# Altium PCB XY131B 65W-2C1A-V1.PcbDoc (part 1 of 2)
Units mm, origin at the board's own origin, x right, y up, seen from the top; angles counter-clockwise.
Board outline 28.2 x 43.45 mm, 4 copper layers (Top Layer, Signal Layer 1, Signal Layer 2, Bottom Layer), stack 0.778 mm thick; 73 components, 414 nets, 330 pads, 508 vias.
Unrouted connection lines stored in the file: 3.
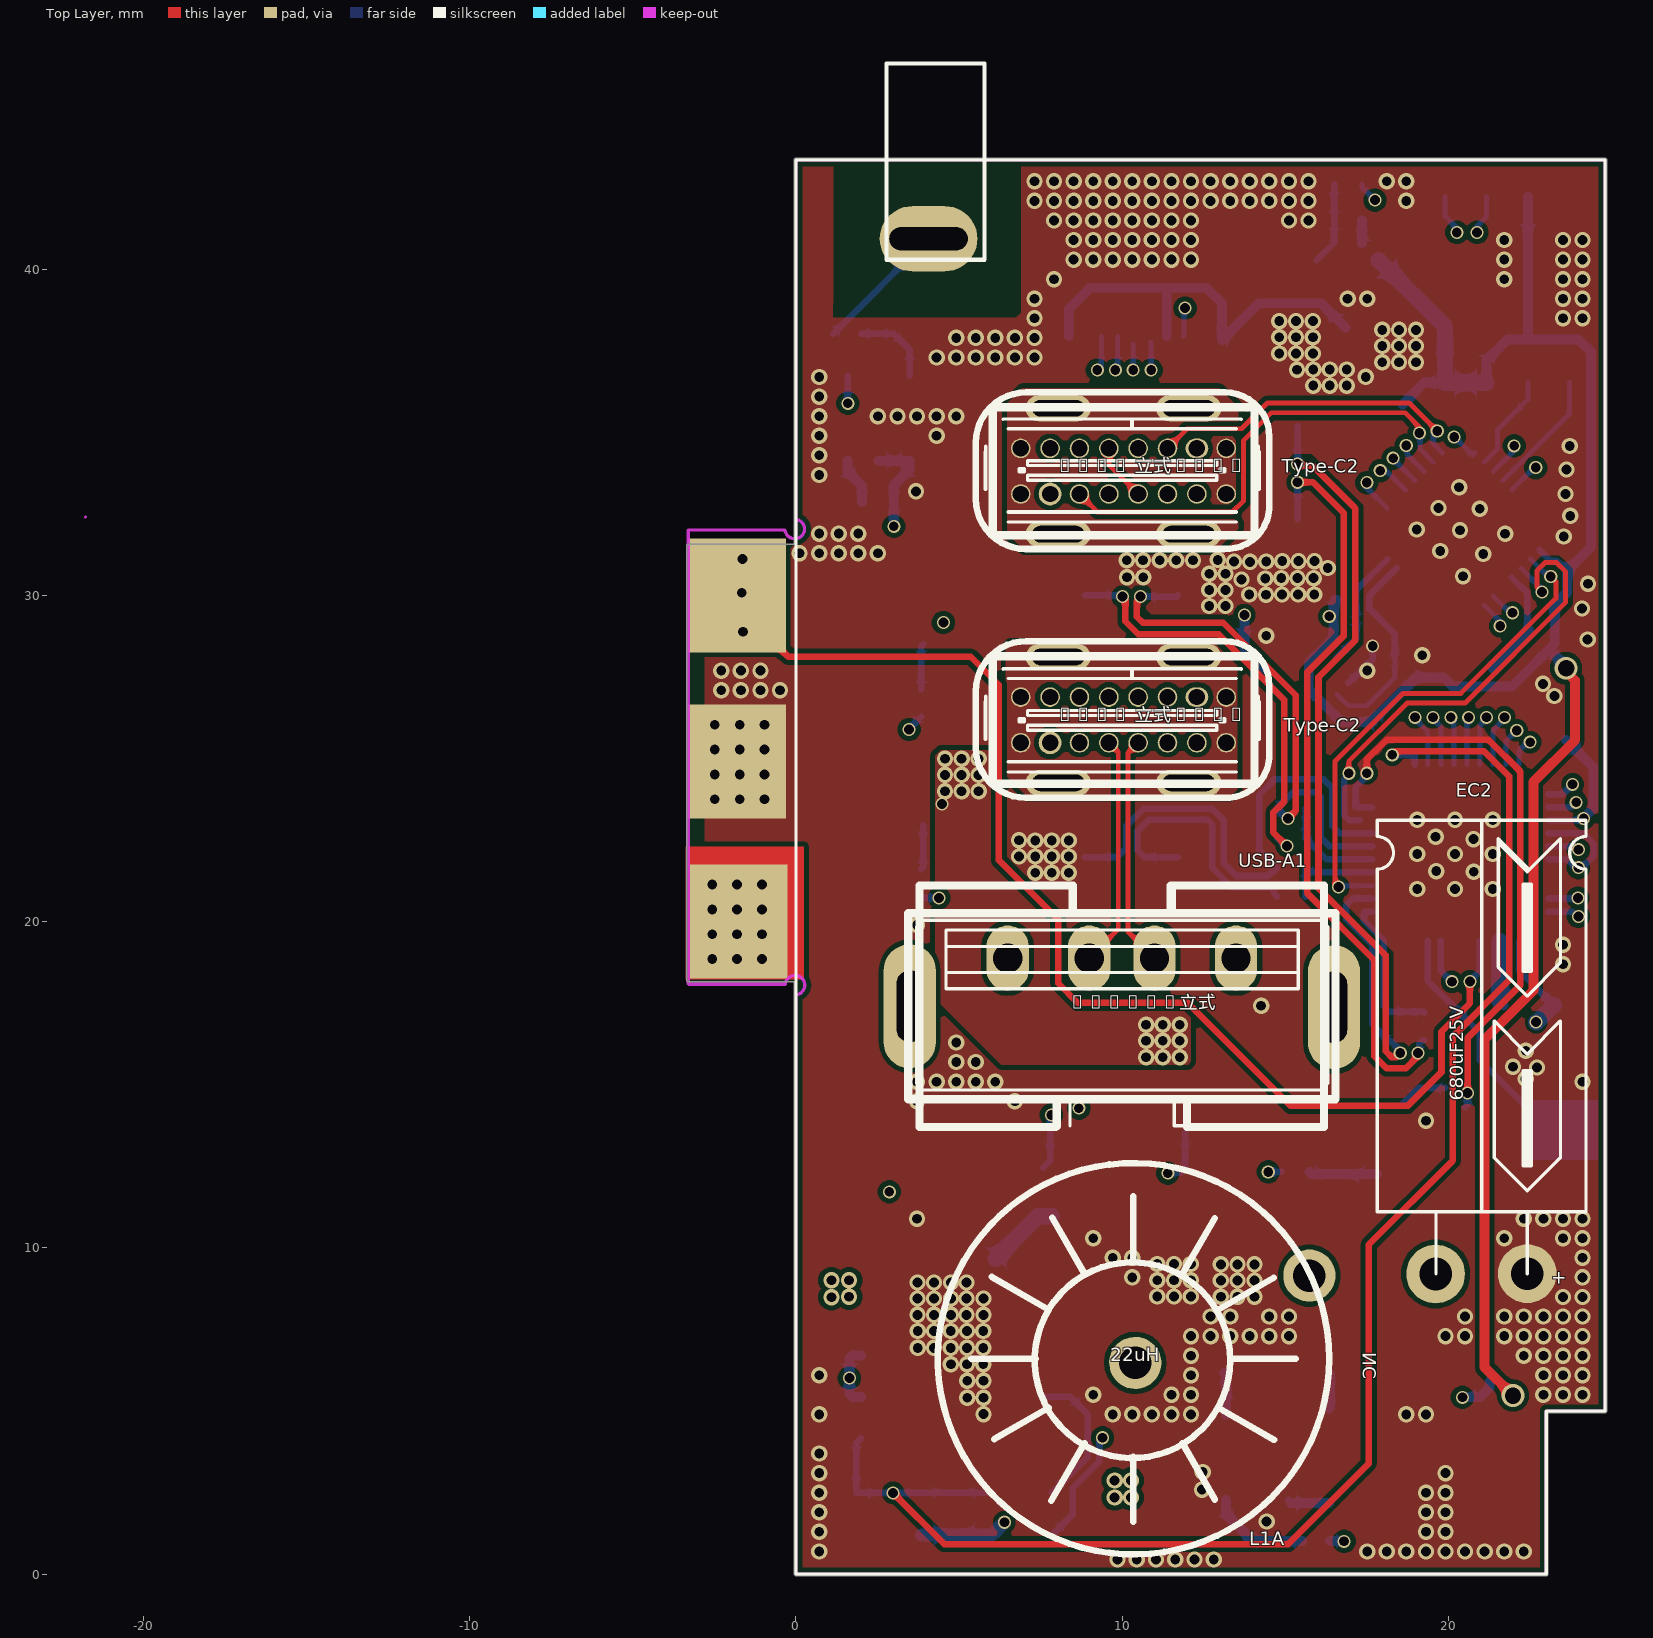
[diagram p0: Top Layer view]
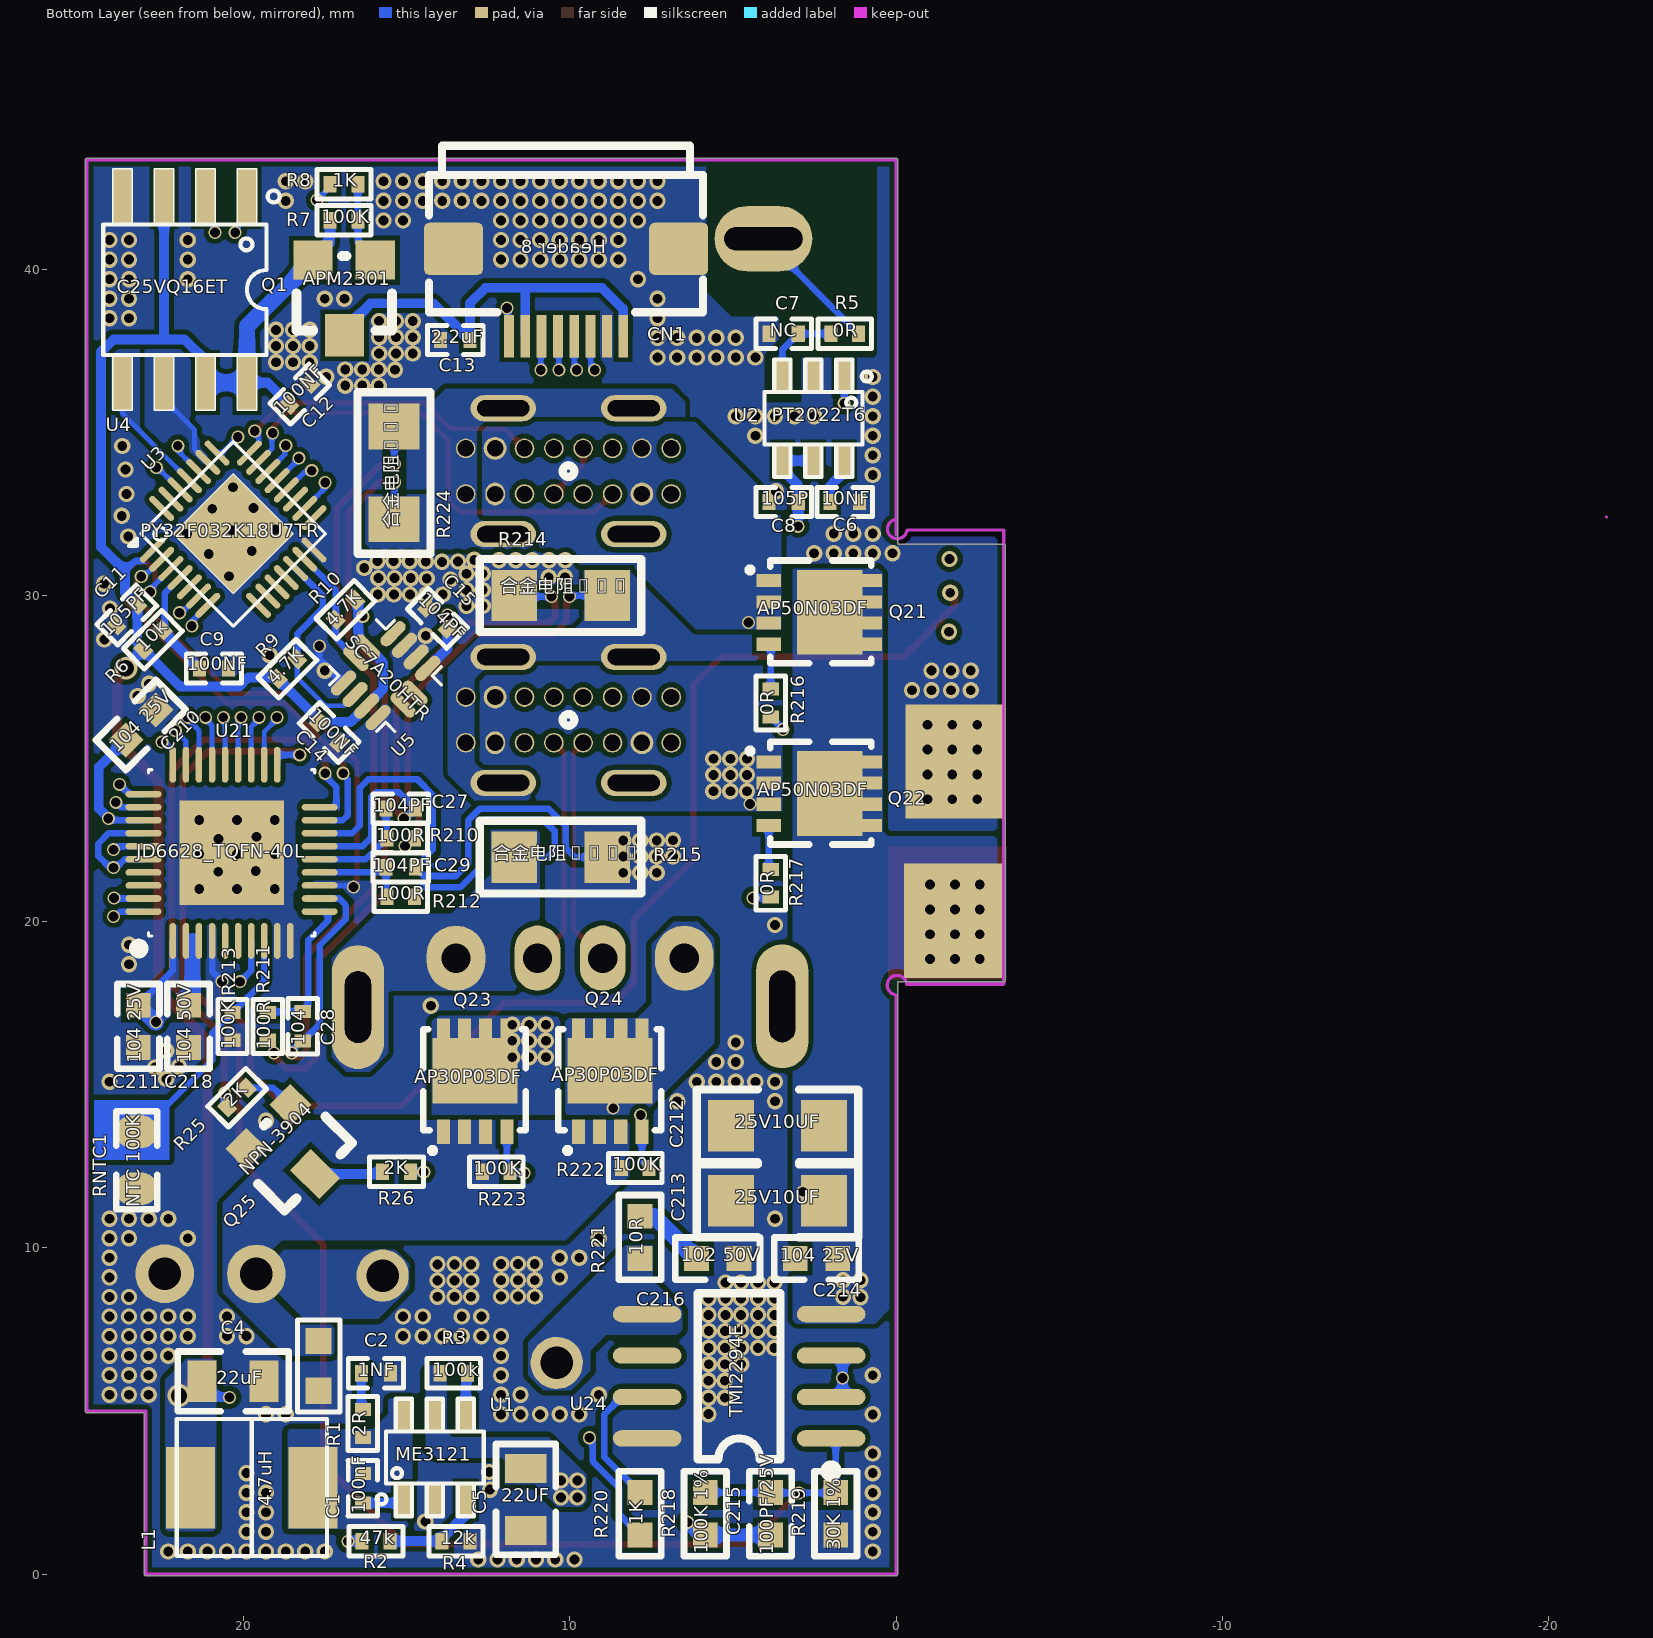
[diagram p1: Bottom Layer view, seen from below]
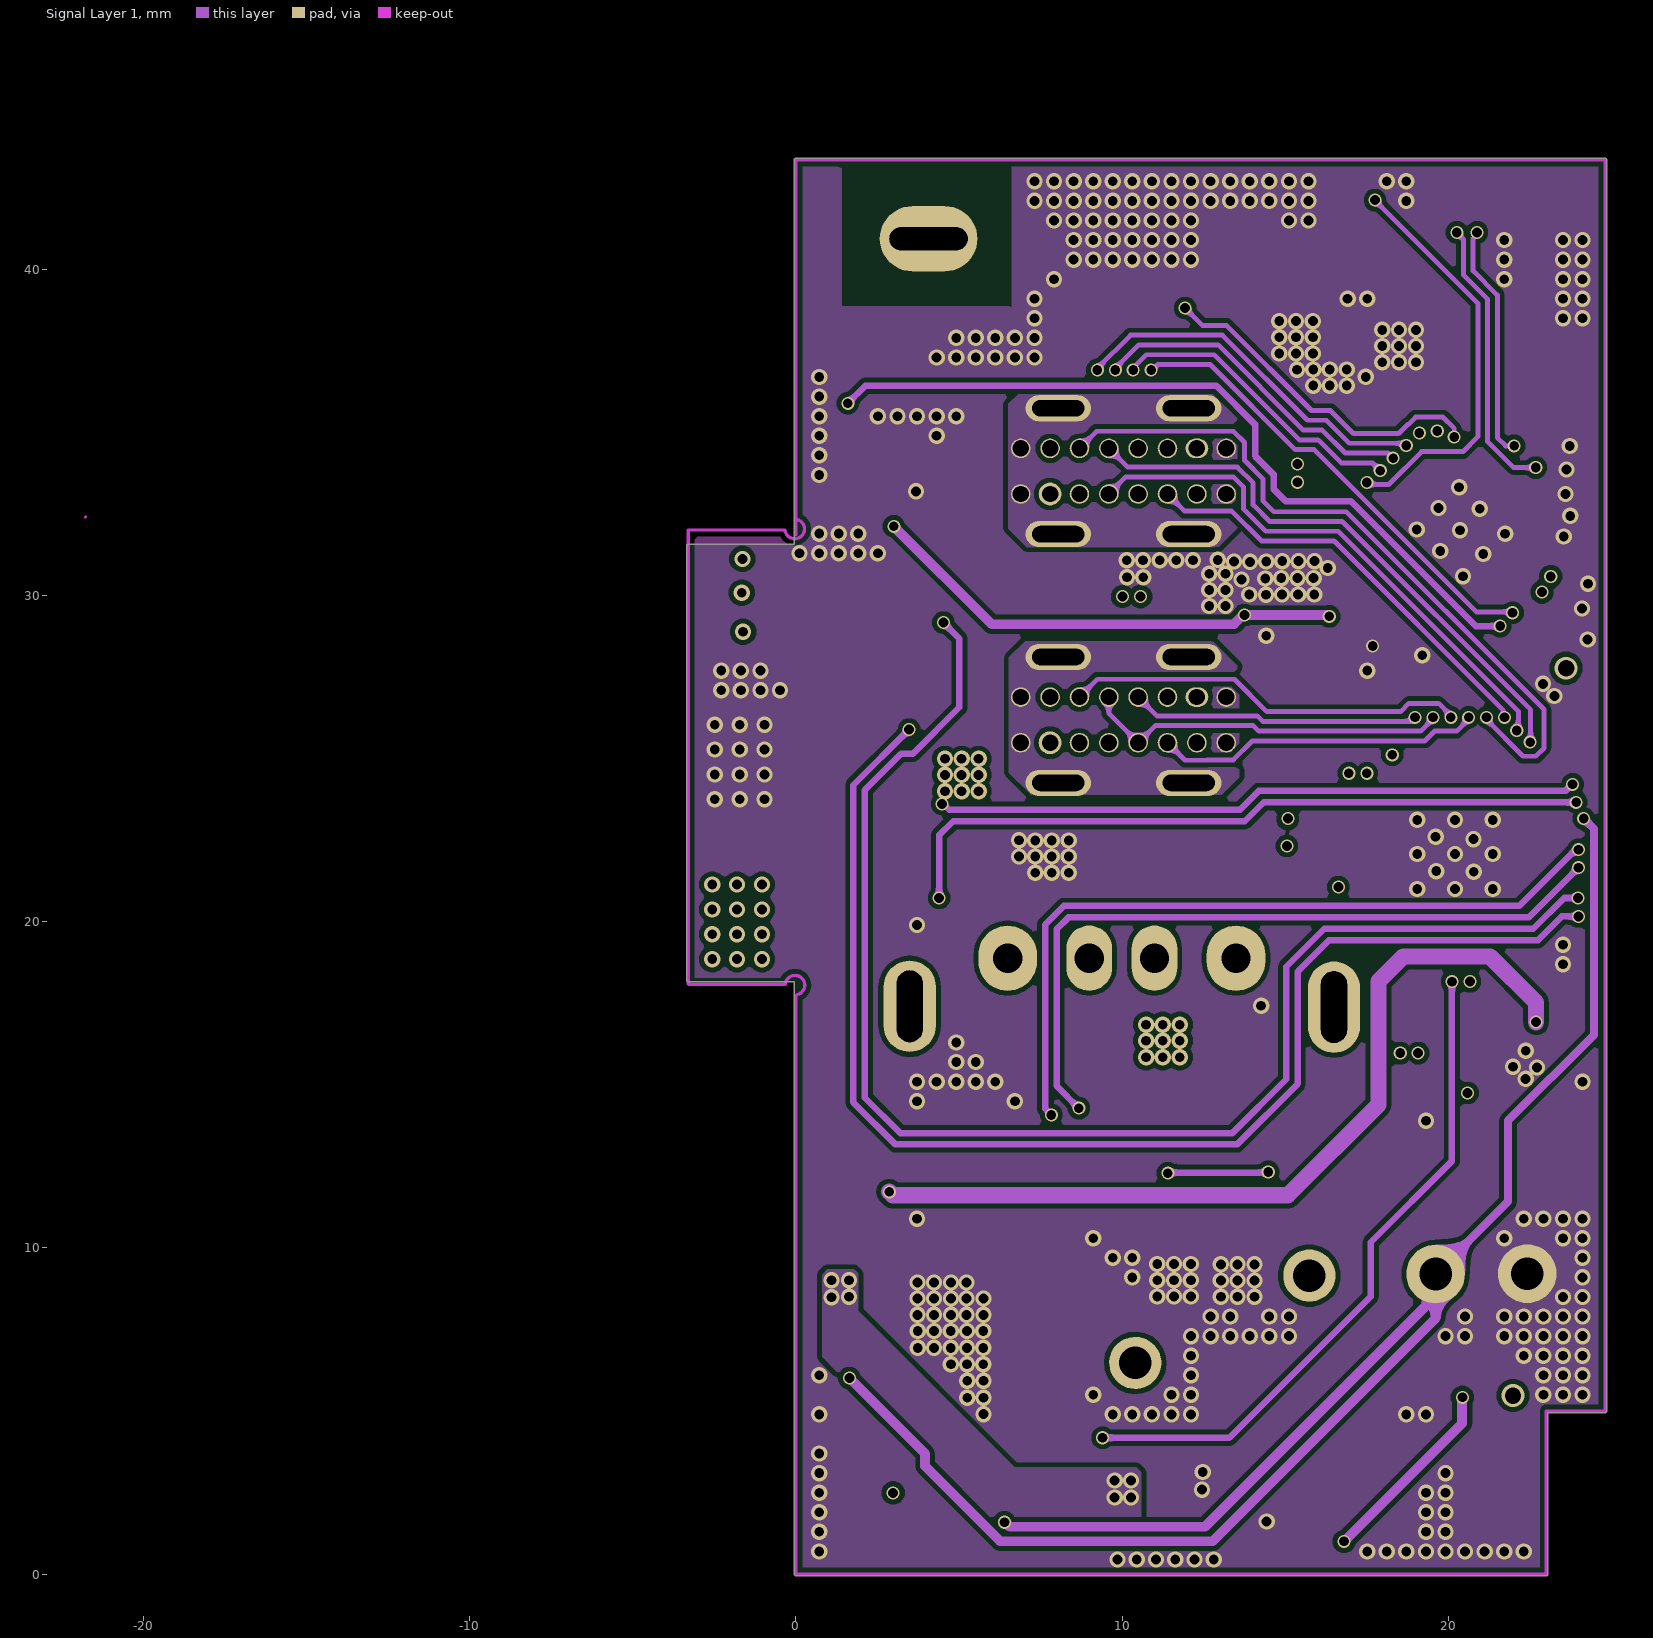
[diagram p2: Signal Layer 1]
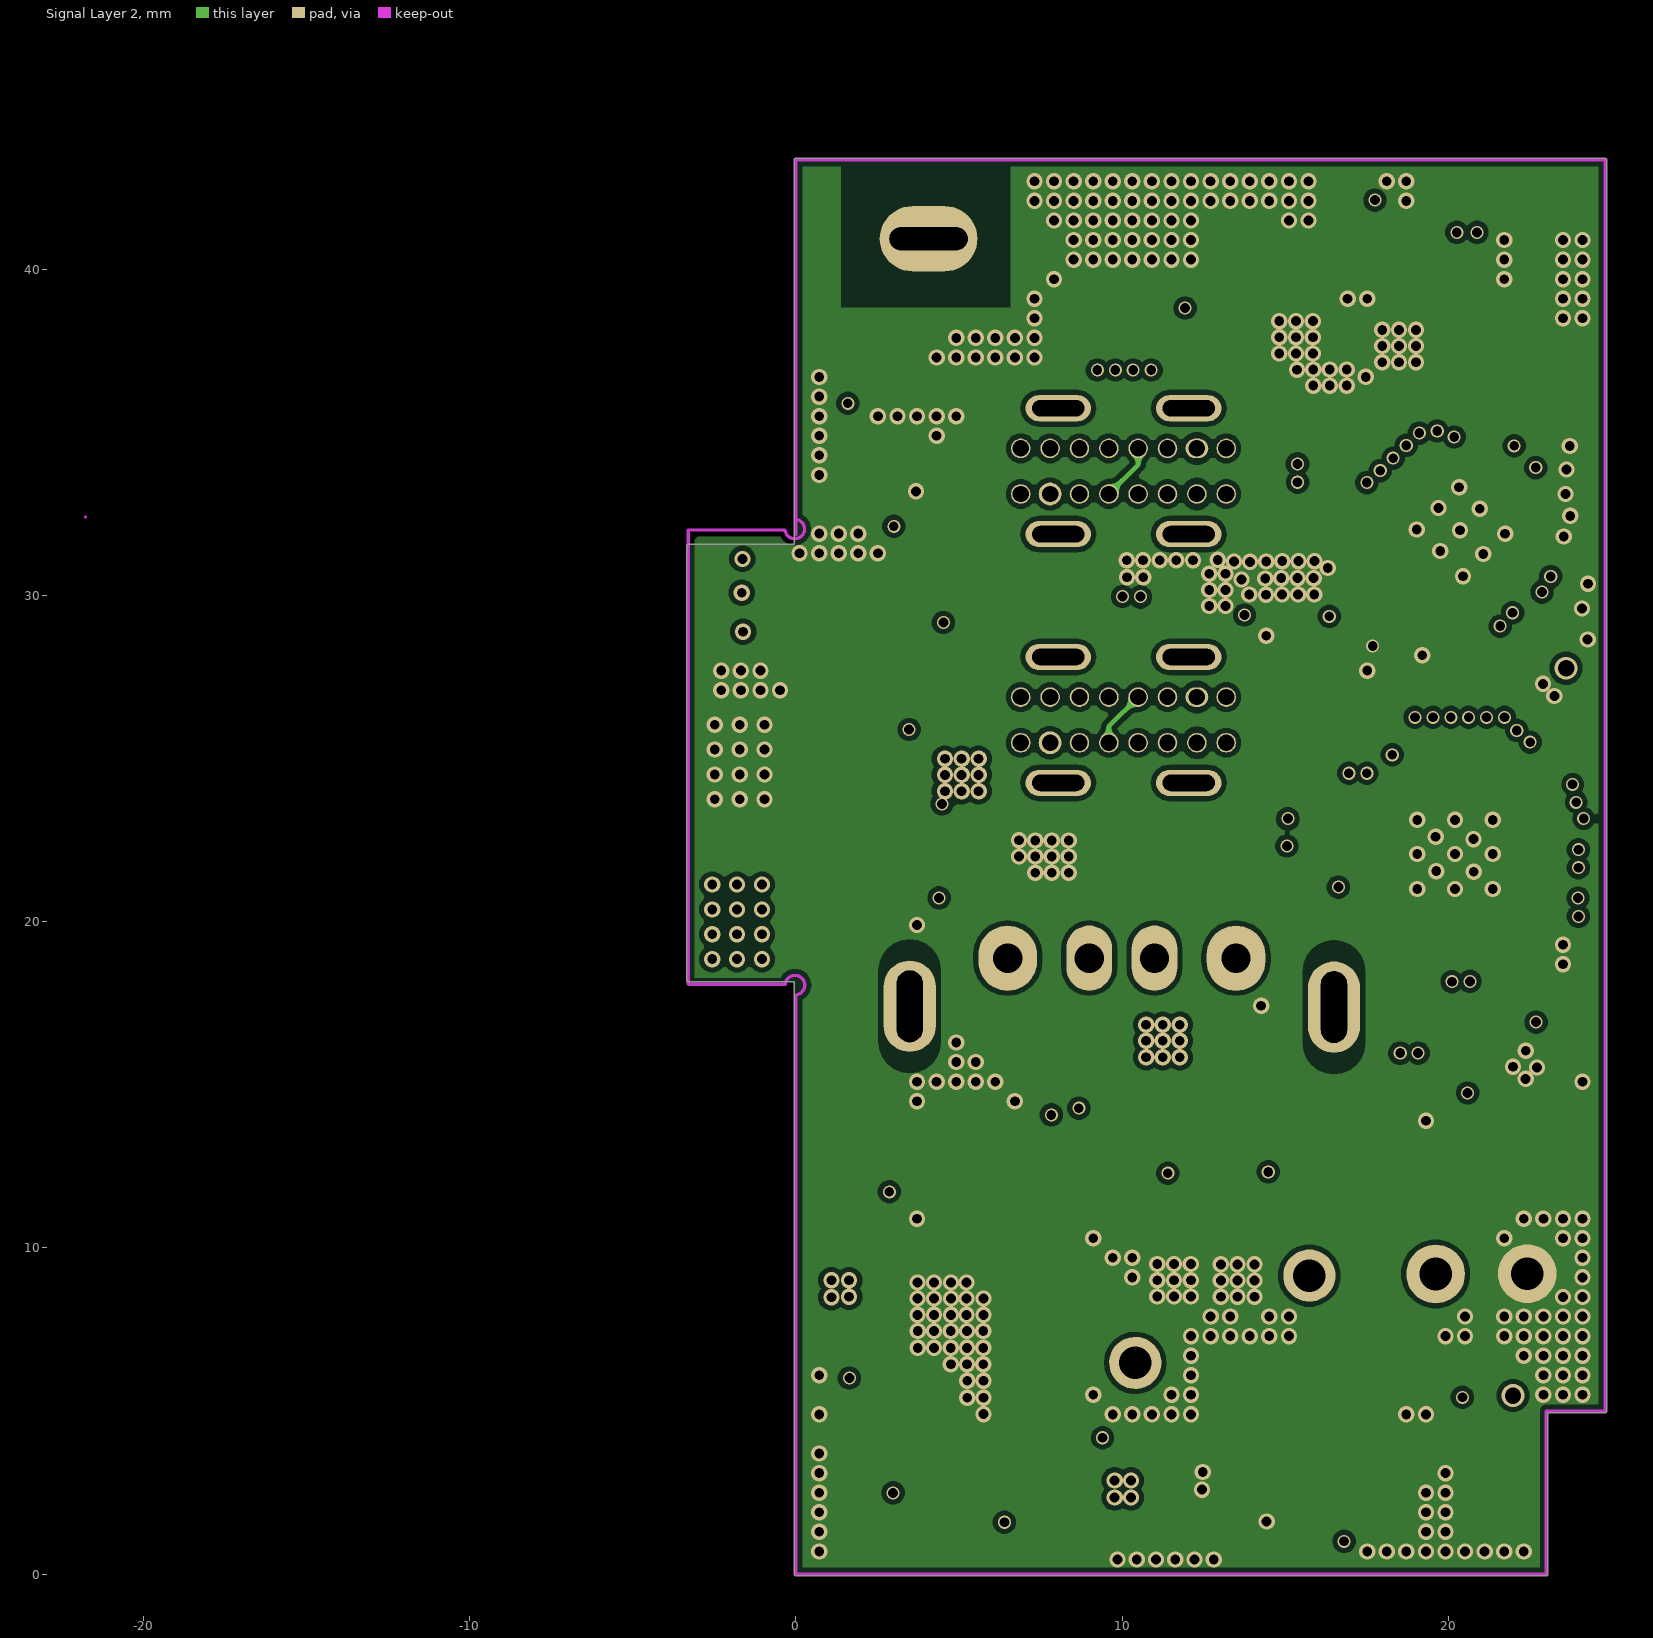
[diagram p3: Signal Layer 2]
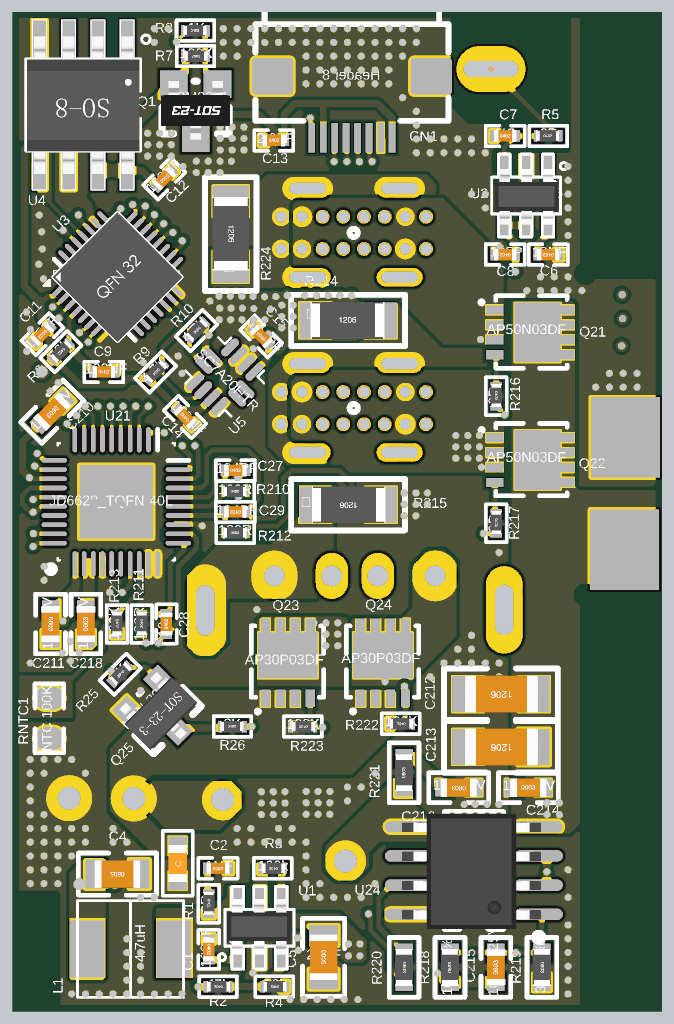
[diagram p5: 3D render of the assembled board from below, using the file's embedded part models]

## Layer stack, top to bottom
Top Solder: solder mask 0.0102, Solder Resist, Dk 3.5
Top Layer: signal copper 0.0356
Dielectric 1: core 0.254, FR-4, Dk 4.2
Signal Layer 1: signal copper 0.036
Dielectric 3: prepreg 0.127, Dk 4.2
Signal Layer 2: signal copper 0.036
Dielectric 2: core 0.254, Dk 4.2
Bottom Layer: signal copper 0.0356
Bottom Solder: solder mask 0.0102, Solder Resist, Dk 3.5

## Board outline
-3.295,18.164 -0.051,18.164 -0.051,0.004 ccw(c0,0.004) -0.036,-0.032 -0.032,-0.036 ccw(c0.004,0) 0.004,-0.051 22.995,-0.051 ccw(c22.995,0) 23.031,-0.036 23.038,-0.029 ccw(c23.003,0.007) 23.053,0.007 23.053,4.951 24.801,4.951 ccw(c24.801,5.001) 24.852,5.001 24.852,43.352 ccw(c24.801,43.352) 24.801,43.402 0.001,43.402 ccw(c0.001,43.352) -0.035,43.388 ccw(c0.028,43.325) -0.035,43.387 -0.035,43.388 -0.035,43.387 ccw(c0,43.351) -0.047,43.37 ccw(c0,43.35) -0.051,43.35 -0.051,31.568 -3.303,31.568 ccw(c-3.303,31.517) -3.353,31.517 -3.353,18.22 ccw(c-3.303,18.22) -3.328,18.176 ccw(c-3.295,18.214)

## Design rules (kind name [scope] priority, off if disabled: settings)
Clearance [All] p1: gap=0.15 ignorepadtopadclearanceinfootprint=FALSE
ComponentClearance [All] p1: gap=0.05 collisioncheckmode=3 verticalgap=0.05 showdistances=FALSE
PlaneConnect [All] p1: planeconnectstyle=Direct reliefexpansion=0.508 reliefentries=4 reliefconductorwidth=0.254 reliefairgap=0.254
PolygonConnect [All] p1: connectstyle=Direct reliefconductorwidth=0.254 reliefentries=4 polygonreliefangle="90 Angle" airgapwidth=0.254
RoutingCorners [All] p1: cornerstyle=45-Degree minsetback=0.1 maxsetback=0.1
RoutingVias [All] p1: holewidth=0.3 width=0.4 viastyle="Through Hole" minholewidth=0.3 minwidth=0.4 maxholewidth=0.3 maxwidth=0.4
SolderMaskExpansion [All] p1: expansion=0.102 istentingtop=FALSE
Width [All] p1: maxlimit=1 minlimit=0.1 preferedwidth=0.15 minimp=50.000000 maximp=50.000000 favimp=50.000000
27 further rules are at their usual default settings.

## Classes and differential pairs
component class "A2674  2C1A大板原理图 20221014 A0": C4/NC

## Components (designator, comment, footprint, x,y, rotation, side; value= is the part's Value field where it differs from the comment)
C1 "100nF" "C 0402_L" 16.344,2.631 r270 bottom (schematic designator C2)
C2 "1NF" "C 0402_L" 15.944,6.161 r0 bottom (schematic designator C4)
C2A "NC" 0603C 17.7,5.62 r90 bottom
C4 "22uF" "C 0805_L" 20.32,5.91 r0 bottom (schematic designator C9)
C5 "22UF" "C 0805_L" 11.35,2.29 r270 bottom (schematic designator C10)
C6 "10NF" "C 0402_L" 1.574,32.864 r0 bottom
C7 "NC" "C 0402_L" 3.449,38.024 r180 bottom (schematic designator C13)
C8 "105P" "C 0402_L" 3.449,32.864 r0 bottom (schematic designator C14)
C9 "100NF" "C 0402_L" 20.91,27.76 r180 bottom (schematic designator C19)
C11 "105PF" "C 0402_L" 23.582,29.398 r315 bottom (schematic designator C19)
C12 "100NF" "C 0402_L" 18.28,36.17 r315 bottom (schematic designator C5)
C13 "2.2uF" "C 0402_L" 13.51,37.83 r180 bottom (schematic designator XC24)
C14 "100NF" "C 0402_L" 17.38,25.8 r45 bottom (schematic designator C18)
C15 "104PF" "C 0402_L" 14.06,29.3 r45 bottom (schematic designator C37)
C27 "104PF" "C 0402_L" 15.185,23.47 r180 bottom (schematic designator R17A)
C28 "104" "C 0402_L" 18.19,16.79 r90 bottom (schematic designator R17A)
C29 "104PF" "C 0402_L" 15.185,21.67 r0 bottom (schematic designator R17A)
C210 "104 25V" "C 0603_L"#1 23.15,26.03 r315 bottom (schematic designator XC24)
C211 "104 25V" "C 0603_L"#1 23.23,16.79 r270 bottom (schematic designator XC24)
C212 "25V10UF" "C 1206_L"#1 3.61,13.74 r0 bottom (schematic designator EC1)
C213 "25V10UF" "C 1206_L"#2 3.61,11.44 r0 bottom (schematic designator EC4)
C214 "104 25V" "C 0603_L"#2 2.44,9.67 r180 bottom (schematic designator C18)
C215 "100PF/25V" "C 0603_L"#1 3.85,1.85 r90 bottom (schematic designator XC24)
C216 "102 50V" "C 0603_L"#2 5.47,9.67 r0 bottom (schematic designator C6A)
C218 "104 50V" "C 0603_L"#1 21.69,16.79 r90 bottom (schematic designator XC24)
CN1 "Header 8" FPC_SMD_P0.5_8P 10.167,40.36 r0 bottom (schematic designator OLED?)
EC2 "680uF25V" 6*12W 24.22,11.11 r90 top
L1 "4.7uH" 电感0420 19.75,2.65 r0 bottom
L1A "22uH" L12 11.28,6.37 r170 top locked
Q1 "APM2301" SOT23-MOS 16.83,39.62 r0 bottom (schematic designator Q6)
Q21 "AP50N03DF" DFN3*3mm 2.37,29.48 r270 bottom (schematic designator Q1A)
Q22 "AP50N03DF" DFN3*3mm 2.37,23.925 r270 bottom (schematic designator Q2A)
Q23 "AP30P03DF" DFN3*3mm 12.905,15.093 r180 bottom (schematic designator Q3A)
Q24 "AP30P03DF" DFN3*3mm 8.765,15.093 r180 bottom (schematic designator Q5A)
Q25 "NPN-3904" "SOP-23-3 NPN/PNP" 18.521,12.989 r315 bottom (schematic designator Q4A)
R1 "2R" "R 0402_L"#1 16.344,4.641 r270 bottom (schematic designator R6)
R2 "47k" "R 0402_L"#1 15.919,1.011 r0 bottom (schematic designator R7)
R3 "100k" "R 0402_L"#1 13.534,6.161 r0 bottom (schematic designator R8)
R4 "12k" "R 0402_L"#1 13.464,1.011 r0 bottom (schematic designator R9)
R5 "0R" "R 0402_L"#1 1.599,38.024 r180 bottom (schematic designator R11)
R6 "10k" "R 0402_L"#1 22.762,28.658 r315 bottom (schematic designator R12)
R7 "100K" "R 0402_L"#1 16.9,41.5 r0 bottom (schematic designator R15)
R8 "1K" "R 0402_L"#1 16.95,42.61 r180 bottom (schematic designator R16)
R9 "4.7K" "R 0402_L"#1 18.642,27.768 r315 bottom (schematic designator R13)
R10 "4.7K" "R 0402_L"#1 16.862,29.578 r315 bottom
R25 "2K" "R 0402_L"#1 20.183,14.622 r315 bottom (schematic designator XC24)
R26 "2K" "R 0402_L"#1 15.34,12.33 r180 bottom (schematic designator XC24)
R210 "100R" "R 0402_L"#2 15.21,22.56 r180 bottom (schematic designator R31)
R211 "100R" "R 0402_L"#2 19.265,16.815 r270 bottom (schematic designator R31)
R212 "100R" "R 0402_L"#2 15.21,20.76 r180 bottom (schematic designator R31)
R213 "100K" "R 0402_L"#1 20.34,16.815 r270 bottom (schematic designator R31)
R214 "合金电阻5mΩ" "R 1206_L" 10.31,30 r180 bottom (schematic designator R2A)
R215 "合金电阻10mΩ" "R 1206_L" 10.26,21.98 r0 bottom (schematic designator R22A)
R216 "0R" "R 0402_L"#3 3.84,26.73 r270 bottom (schematic designator C18)
R217 "0R" "R 0402_L"#1 3.84,21.2 r270 bottom (schematic designator C18)
R218 "100K 1%" "R 0603_L"#1 5.85,1.85 r90 bottom (schematic designator XC24)
R219 "30K 1%" "R 0603_L"#1 1.85,1.85 r270 bottom (schematic designator XC24)
R220 "1K" "R 0603_L"#2 7.85,1.85 r270 bottom (schematic designator C18)
R221 "10R" "R 0603_L"#1 7.85,10.32 r90 bottom (schematic designator XC24)
R222 "100K" "R 0402_L"#1 7.97,12.45 r0 bottom (schematic designator R20)
R223 "100K" "R 0402_L"#4 12.23,12.33 r0 bottom (schematic designator R4A)
R224 "合金电阻5mΩ" "R 1206_L" 15.39,33.78 r270 bottom (schematic designator R2A)
RNTC1 "NTC 100K" NTC1 23.28,12.72 r270 bottom (schematic designator R31)
Type-C2 "type 立式16PN" PCBComponent_1 10.042,26.185 r270 top
Type-C2 "type 立式16PN" PCBComponent_1 10.042,33.81 r270 top
U1 "ME3121" SOT23-6 14.124,3.571 r90 bottom
U2 "PT2022T6" SOT23-6 2.549,35.434 r270 bottom
U3 "PY32F032K18U7TR" "QFN32 4*4" 22.795,31.395 r225 bottom
U4 "C25VQ16ET" SOP8 21.73,39.35 r270 bottom (schematic designator U5)
U5 "SC7A20HTR" SC7A20 15.724,27.465 r135 bottom (schematic designator U9)
U21 "JD6628_TQFN-40L" QFN5*5-40L 22.17,19.41 r90 bottom (schematic designator UB1)
U24 "TMI2294E" SOP-8 1.992,4.16 r90 bottom (schematic designator U2A)
USB-A1 "USB-A-立式" A口直插-10mm 9.992,18.131 r0 top locked (schematic designator USBA1)

## Footprints (in the part's own frame and the unit in brackets; to place one, negate y for a bottom-side part, rotate by r counter-clockwise, add the part's x,y. Pads: shape width x height; smd on the part's side, far side on the other; paste and mask are expansions set on the pad)
6*12W [mm]
  round 1.8 hole 1: 1(-1.91,4.61) 2(-1.9,1.8)
  silkscreen extent -1.91,0 12,6.4
0603C [mm]
  rect 0.8x0.8 smd mask+0.051: 2(1.52,0) ""(0,0)
  silkscreen extent -0.65,-0.65 2.17,0.65, body extent -0.05,-0.41 1.55,0.4, height 0.88
A口直插-10mm [mm]
  oval 1.3x2 / inner oval 1.8x2 / far side oval 1.8x2 hole 0.9: 1(-3.5,0.75) 4(3.5,0.75)
  oval 1.3x2 / inner oval 1.4x2 / far side oval 1.4x2 hole 0.9: 2(-1,0.75) 3(1,0.75)
  oval 1.6x3.8 / inner oval 1.6x2.8 / far side oval 1.6x3.8 hole 0.8 slot 2.2 at 90 deg: 5(6.502,-0.75) 6(-6.502,-0.725)
  silkscreen extent -6.55,-4.42 6.55,2.97
"C 0402_L" [mm] "无极性贴片电容         淘宝ID:黄晶宝石"
  rect 0.4x0.5 smd: 1(-0.45,0) 2(0.45,0)
  silkscreen extent -0.85,-0.45 0.85,0.45, body extent -0.5,-0.26 0.5,0.26, height 0.53
"C 0603_L"#1 [mil] "无极性贴片电容                                       淘宝ID:黄晶宝石"
  rect 30x30 smd: 1(-25.59,0) 2(25.59,0)
  silkscreen extent -51,-26 51,26, body extent -31,-16 31,16, height 32
"C 0603_L"#2 [mil] "无极性贴片电容                                       淘宝ID:黄晶宝石"
  rect 30x30 smd mask+2: 1(-25.59,0) 2(25.59,0)
  silkscreen extent -51,-26 51,26, body extent -31,-16 31,16, height 32
"C 0805_L" [mil] "无极性贴片电容                                        淘宝ID:黄晶宝石"
  rect 35x50 smd: 1(-37.4,0) 2(37.4,0)
  silkscreen extent -67,-36 67,36, body extent -39,-24 39,24, height 20
"C 1206_L"#1 [mil] "无极性贴片电容"
  rect 55x62 smd mask+1.97: 1(-55.12,0) 2(57.09,0)
  silkscreen extent -96,-44 98,44, body extent -63,-32 63,32, height 48
"C 1206_L"#2 [mil] "无极性贴片电容"
  rect 55x62 smd: 1(-55.12,0)
  rect 55x62 smd mask+1.97: 2(57.09,0)
  silkscreen extent -96,-44 98,44, body extent -63,-32 63,32, height 48
DFN3*3mm [mm]
  rect 0.4x0.8 smd mask+0.051: D(-0.975,1.533) D(-0.325,1.533) D(0.325,1.533) D(0.975,1.533)
  rect 2.6x2 smd mask+0.051: D(-0.005,0.333)
  rect 0.4x0.75 smd mask+0.051: G(0.975,-1.533) S(-0.975,-1.533) S(-0.325,-1.533) S(0.325,-1.533)
  silkscreen extent -1.59,-2.18 1.56,1.61
FPC_SMD_P0.5_8P [mm]
  rect 0.3x1.3 smd paste+0 mask+0.05: 1(-1.8,2.414) 2(-1.302,2.412) 3(-0.8,2.414) 4(-0.3,2.414) 5(0.2,2.414) 6(0.7,2.414) 7(1.2,2.414) 8(1.7,2.414)
  rrect20% 1.8x1.6 smd: 9(3.4,-0.266) 10(-3.5,-0.266)
  silkscreen extent -4.25,-3.43 4.15,1.67
L12 [mm]
  round 1.6 hole 1: 1(0.883,0.048) 2(-3.909,-3.512)
  silkscreen extent -5.04,-6.07 6.96,5.93
NTC1 [mm]
  oval 1x1.3 smd: 1(-0.84,0) 2(0.91,0)
  silkscreen extent -1.47,-0.63 1.53,0.62
PCBComponent_1 [mm]
  round 0.6 hole 0.5: A1(-0.7,-3.15) A4(-0.7,-2.25) "A5 CC1"(-0.7,-1.35) A6DP1(-0.7,-0.45) A7DM1(-0.7,0.45) A8SUB1(-0.7,1.35) A12(-0.7,3.15) B1(0.7,3.15) B5CC2(0.7,1.35) B6DP1(0.7,0.45) B7DM1(0.7,-0.45) B8SUB2(0.7,-1.35) B12(0.7,-3.15)
  oval 0.6x0.7 / inner oval 0.6x0.7 / far side round 0.7 hole 0.5: A9(-0.7,2.25)
  round 0.6 / inner round 0.6 / far side oval 0.7x0.6 hole 0.5: B4(0.7,2.25)
  round 0.7 hole 0.5: B9(0.7,-2.25)
  oval 0.8x2 hole 0.5 slot 1.6 at 90 deg: GND(-1.93,-2) GND(-1.93,2) GND(1.93,-2) GND(1.93,2)
  silkscreen extent -2.41,-4.53 2.39,4.47, body extent -2.08,-4.47 2.08,4.47, height 10
QFN5*5-40L [mm] "QFN-40L 5*5"
  oval 1.1x0.2 smd: 1(0,0) 2(0,-0.4) 3(0,-0.8) 4(0,-1.2) 5(0,-1.6) 6(0,-2) 7(0,-2.4) 8(0,-2.8) 9(0,-3.2) 10(0,-3.6) 22(5.4,-3.2) 23(5.4,-2.8) 24(5.4,-2.4) 25(5.4,-2) 26(5.4,-1.6) 27(5.4,-1.2) 28(5.4,-0.8) 29(5.4,-0.4) 30(5.4,0)
  oval 0.2x1.1 smd: 11(0.9,-4.5) 12(1.3,-4.5) 13(1.7,-4.5) 14(2.1,-4.5) 15(2.5,-4.5) 16(2.9,-4.5) 17(3.3,-4.5) 18(3.7,-4.5) 19(4.1,-4.5) 31(4.5,0.9) 32(4.1,0.9) 33(3.7,0.9) 34(3.3,0.9) 35(2.9,0.9) 36(2.5,0.9) 37(2.1,0.9) 38(1.7,0.9) 39(1.3,0.9) 40(0.9,0.9)
  oval 0.2x1.1 on Bottom Overlay: 20(4.5,-4.5)
  oval 1.1x0.2 on Bottom Overlay: 21(5.4,-3.6)
  rect 3.2x3.2 smd: 41(2.7,-1.8)
  silkscreen extent -0.38,-4.35 5.25,1.2, body extent 0.15,-4.35 5.25,0.75, height 0.8
"QFN32 4*4" [mm]
  oval 0.2x1 smd: 1(0,0) 2(0.4,0) 3(0.8,0) 4(1.2,0) 5(1.6,0) 6(2,0) 7(2.4,0) 17(2.8,4.2) 18(2.4,4.2) 19(2,4.2) 20(1.6,4.2) 21(1.2,4.2) 22(0.8,4.2) 23(0.4,4.2) 24(0,4.2)
  oval 0.2x1 on Bottom Solder: 8(2.8,0)
  oval 1x0.2 on Bottom Overlay: 9(3.5,0.7) 32(-0.7,0.7)
  oval 1x0.2 smd: 10(3.5,1.1) 11(3.5,1.5) 12(3.5,1.9) 13(3.5,2.3) 14(3.5,2.7) 15(3.5,3.1) 16(3.5,3.5) 25(-0.7,3.5) 26(-0.7,3.1) 27(-0.7,2.7) 28(-0.7,2.3) 29(-0.7,1.9) 30(-0.7,1.5) 31(-0.7,1.1)
  rect 2.6x2.6 smd: 33(1.4,2.1)
  silkscreen extent -0.6,-0.42 3.4,4.1, body extent -0.59,0.09 3.41,4.09, height 0.57
"R 0402_L"#1 [mm] "1/16W贴片电阻     淘宝ID:黄晶宝石"
  rect 0.4x0.5 smd: 1(-0.4,0) 2(0.45,0)
  silkscreen extent -0.8,-0.45 0.85,0.45, body extent -0.5,-0.25 0.5,0.25, height 0.3
"R 0402_L"#2 [mm] "1/16W贴片电阻     淘宝ID:黄晶宝石"
  rect 0.4x0.5 smd paste-0.067 mask-0.018: 1(-0.4,0) 2(0.45,0)
  silkscreen extent -0.8,-0.45 0.85,0.45, body extent -0.5,-0.25 0.5,0.25, height 0.3
"R 0402_L"#3 [mm] "1/16W贴片电阻     淘宝ID:黄晶宝石"
  rect 0.4x0.5 smd mask+0.051: 1(-0.4,0) 2(0.45,0)
  silkscreen extent -0.8,-0.45 0.85,0.45, body extent -0.5,-0.25 0.5,0.25, height 0.3
"R 0402_L"#4 [mm] "1/16W贴片电阻     淘宝ID:黄晶宝石"
  rect 0.4x0.5 smd mask+0.02: 1(-0.4,0) 2(0.45,0)
  silkscreen extent -0.8,-0.45 0.85,0.45, body extent -0.5,-0.25 0.5,0.25, height 0.3
"R 0603_L"#1 [mil] "1/10W贴片电阻                 淘宝ID:黄晶宝石"
  rect 30x30 smd: 1(-25.59,0) 2(25.59,0)
  silkscreen extent -51,-26 51,26, body extent -31,-16 31,16, height 16
"R 0603_L"#2 [mil] "1/10W贴片电阻                 淘宝ID:黄晶宝石"
  rect 30x30 smd mask+2: 1(-25.59,0) 2(25.59,0)
  silkscreen extent -51,-26 51,26, body extent -31,-16 31,16, height 16
"R 1206_L" [mil] "1/4W贴片电阻"
  rect 55x62 smd mask+1.97: 1(-55.12,0) 2(57.09,0)
  silkscreen extent -96,-44 98,44, body extent -63,-31 63,31, height 22
SC7A20 [mm]
  oval 0.95x0.35 smd mask+0.102: 1(-0.963,0.754) 7(1.177,-0.754)
  oval 0.95x0.35 smd: 2(-0.963,0.254) 3(-0.963,-0.246) 4(-0.963,-0.746) 8(1.177,-0.254) 9(1.177,0.246) 10(1.177,0.746)
  oval 0.35x0.95 smd: 5(-0.147,-1.016) 6(0.361,-1.016) 11(0.337,1.016) 12(-0.163,1.016)
  silkscreen extent -1.3,-1.41 1.51,1.41
SOP8 [mm]
  rect 1.7x0.6 smd: 1(-2.875,1.83) 2(-2.875,0.56) 3(-2.875,-0.71) 4(-2.875,-1.98) 5(2.825,-1.98) 6(2.825,-0.71) 7(2.825,0.56) 8(2.825,1.83)
  silkscreen extent -3.73,-2.58 3.68,2.83, body extent -3.01,-2.52 2.99,2.38, height 1.7
SOP-8 [mm]
  oval 0.5x2.1 smd: 1FB(0,0) 2CSP(1.27,0) 3CSN(2.54,0) 4Vin(3.81,0) 5SW(3.81,5.638) 6SW(2.54,5.638) 7FS(1.27,5.638) 8GND(0,5.638)
  silkscreen extent -1.12,-0.12 4.44,4.09, body extent -0.66,-0.1 4.4,5.95, height 1.67
"SOP-23-3 NPN/PNP" [mil]
  rect 36x36 smd: 1(-37.5,-40) 2(37.5,-40)
  rect 36x50 smd: 3(0.5,40)
  silkscreen extent -58,-45 58,45, body extent -57,-50 57,60, height 47
SOT23-6 [mm]
  rect 1x0.5 smd: 1(-1.298,0.964) 2(-1.298,0.014) 3(-1.298,-0.936) 4(1.302,-0.936) 5(1.302,0.014) 6(1.302,0.964)
  silkscreen extent -1.8,-1.49 1.8,1.8, body extent -1.16,-1.37 1.26,1.43, height 1.09
SOT23-MOS [mm]
  rect 1.2x1.3 smd: D(0.075,1.64)
  rect 1.2x1.2 smd: G(-0.865,-0.66) S(1.04,-0.66)
  silkscreen extent -1.37,-0.79 1.55,1.5, body extent -1.41,-0.79 1.59,1.76, height 1
电感0420 [mm]
  rect 1.5x2.5 smd: 1(-1.875,0) 2(1.875,0)
  silkscreen extent -2.3,-2.1 2.3,2.1

## Part data
C1: library part 22nF, "贴片电容：100NF/25V-X7R-0402", Contributor=LCEDA_Lib, nameAlias=Value(F), spicePre=C, spiceSymbolName=C_0603_US
C2: library part C0402, "贴片电容：1NF/50V-X7R-0402", Comment_1=C0402, PCB DECAL=0402
C2A C216: library part CAP
C4: "贴片电容：22UF/10V-X7R-0805", Contributor=LCEDA_Lib, nameAlias=Value(F), spicePre=C, spiceSymbolName=C_0805_US
C5: library part 10uF, "贴片电容：22UF/35V-X7R-0805", Contributor=LCEDA_Lib, nameAlias=Value(F), spicePre=C, spiceSymbolName=C_0603_US
C6: library part CAP, "贴片电容：10NF/10V-X5R-0402"
C7: library part CAP, "贴片电容：NC"
C8: library part CAP, "贴片电容：105P/10V-X5R-0402"
C9 C12 C14: library part 0.1u, "贴片电容：100NF/10V-X5R-0402", Add into BOM=yes, Convert to PCB=yes, Device=0.1u, FootprintName=C0603, ModelId=ac9b32e974bc448eab36b1293f859dcb, ModelName=C0603_L1.6-W0.8-H0.8, ModelTransform=v2:[39.37007874015748,0,0,0,39.37007874015748,0,0,0,39.37007874015748,0.001,0,0], SymbolName=0.1u
  C9: UniqueId=ggeeecb535e2993774a
  C12: UniqueId=ggeef7817906d228245
  C14: UniqueId=gge4f251fc7ae9908d9
C11: library part 0.1u, "贴片电容：105P/10V-X5R-0402", Add into BOM=yes, Convert to PCB=yes, Device=0.1u, FootprintName=C0603, ModelId=ac9b32e974bc448eab36b1293f859dcb, ModelName=C0603_L1.6-W0.8-H0.8, ModelTransform=v2:[39.37007874015748,0,0,0,39.37007874015748,0,0,0,39.37007874015748,0.001,0,0], SymbolName=0.1u, UniqueId=ggeeecb535e2993774a
C13 C210 C211 C215 C218 R25 R26 R218 R219 R221: library part CAP, "Capacitor"
C15: library part 0.1u, "贴片电容：104P/10V-X5R-0402", Add into BOM=yes, Convert to PCB=yes, Device=0.1u, FootprintName=C0603, ModelId=ac9b32e974bc448eab36b1293f859dcb, ModelName=C0603_L1.6-W0.8-H0.8, ModelTransform=v2:[39.37007874015748,0,0,0,39.37007874015748,0,0,0,39.37007874015748,0.001,0,0], SymbolName=0.1u, UniqueId=ggeeecb535e2993774a
C27 C28 C29 R214 R215 R223 R224: library part "RES SMD"
C212 C213: library part Cap1206, "Cap 1206", Type=贴片电容
C214 R216 R217 R220: library part CAP1, Specification="0603 10uF ±20% 25V X5R"
CN1: "Header, 8-Pin", LatestRevisionDate=17-Jul-2002, LatestRevisionNote="Re-released for DXP Platform.", Publisher="Altium Limited"
L1: "贴片电感：0420-4.7UH", Manufacturer=Sunlord, Manufacturer Part=MPH252012S4R7MT, nameAlias=Inductance, spicePre=L, spiceSymbolName=MPH252012S4R7MT, Supplier=LCSC, Supplier Part=C90256
L1A: library part 功?
Q1: library part MOS_P, "贴片MOS：APM2301-SOT23-3"
Q21 Q22: library part MOS\NMOS\FKS4004, "SOP-8"
Q23 Q24: library part MOS\PMOS\CEM3083, "SOP-8"
Q25: library part NPN, "NPN Transistor"
R1: library part R0402, "贴片电阻：2R-0402-F", Comment_1=R0402, PCB DECAL=0402
R2: library part 75k, "贴片电阻：47K-0402-1%", Contributor=LCEDA_Lib, nameAlias=Value(Ω), spicePre=R, spiceSymbolName=R_0603_US
R3: "贴片电阻：100K-0402-1%", Contributor=LCEDA_Lib, nameAlias=Value(Ω), spicePre=R, spiceSymbolName=R_0603_US
R4: library part 10k, "贴片电阻：12K-0402-1%", Contributor=LCEDA_Lib, nameAlias=Value(Ω), spicePre=R, spiceSymbolName=R_0603_US
R5: library part R, "贴片电阻：0R-0402-F"
R6: "贴片电阻：10K-0402-F", Add into BOM=yes, Convert to PCB=yes, Device=10k, FootprintName=R0603, ModelId=6bd5cd867e9542ebae21caaf5d2d4c4d, ModelName=R0603, ModelTransform=v2:[2.410722045565656e-15,39.37007874015748,0,-39.37007874015748,2.410722045565656e-15,0,0,0,39.37007874015748,0,0,0], SymbolName=10k, UniqueId=gged69dc30bc6f01ca4
R7: library part R, "贴片电阻：100K-0402-F"
R8: library part R, "贴片电阻：1K-0402-F"
R9 R10: library part R, "贴片电阻：4.7K-0402-F"
R210 R211 R212 R213 R222 RNTC1: library part RES
U1: library part TD8113, "贴片IC：ME3121-SOT23-6", LCSC Assembly=Yes, Manufacturer=TMI, Manufacturer Part=STI3470, Contributor=wwjlisa, link=unknown, SMT Type=Extend, spicePre=U, spiceSymbolName=STI3470, Supplier=LCSC, Supplier Part=C478938
U2: library part SOT23-MCU, "贴片触摸：PT2022T6-SOT23-6"
U3: library part PY32F031, "贴片IC：PY32F032K18U7TR-QFN32-4*4", JLCPCB Part Class="Extended Part", Manufacturer=PUYA(普冉), Manufacturer Part=PY32F030K28U6TR, Add into BOM=yes, Convert to PCB=yes, Device=PY32F031, FootprintName=QFN-32_L5.0-W5.0-P0.50-TL-EP3.5, ModelId=595304ab79a843bfa03bdaf869386976, ModelName=QFN-32_L5.0-W5.0-H1.0-P0.50-TL-EP3.5, ModelTransform=v2:[39.37007874015748,0,0,0,39.37007874015748,0,0,0,39.37007874015748,0.001,0,0], Supplier=LCSC, Supplier Part=C3018718, SymbolName=PY32F031, UniqueId=gge62ac414b3116667d
U4: library part P25Q64H-SUH-IT, JLCPCB Part Class="Extended Part", Manufacturer=PUYA(普冉), Add into BOM=yes, Convert to PCB=yes, Device=P25Q64H-SUH-IT, FootprintName=SOP-8_L5.3-W5.3-P1.27-LS8.0-BL, Manufacturer Part=P25Q64H-SUH-IT, ModelId=fc9b9a2dc0bb4458871072ce0a00885d, ModelName=SOP-8_L5.2-W5.3-H2.1-LS7.9-P1.27, ModelTransform=v2:[2.410722045565656e-15,39.37007874015748,0,-39.37007874015748,2.410722045565656e-15,0,0,0,39.37007874015748,0,0,0], Supplier=LCSC, Supplier Part=C414065, SymbolName=P25Q64H-SUH-IT, UniqueId=ggeec8bb7aad7322074
U5: library part sc7a20htr, "贴片IC：SC7A20HTR-LGA-12-2x2x1.0", JLCPCB Part Class="Extended Part", LCSC Part Name=±2G/±4G/±8G/±16G三轴微机械数字加速度计, Manufacturer=SILAN(士兰微), Operating Temperature=-40℃~+85℃, Standby Current=500nA, Voltage - Supply=1.71V~3.6V, Acceleration Measurement Range (MAX)=±16g, Accelerometer Sensing Axis=X,Y,Z, AddInBom=yes, Cache Size=-, ConvertToPcb=yes, Datasheet=https://item.szlcsc.com/datasheet/SC7A20HTR/20603496.html, Features=运动事件检测, FootprintName=LGA-12_L2.0-W2.0-P0.50-TL, Gyroscope Measurement Range (MAX)=-, Gyroscope Sensing Axis=-, Interface=I2C；SPI, ManufacturerPart=SC7A20HTR, ModelId=f8457c06ad0d429192ad95232aa1f660, ModelName=LGA-12_L2.0-W2.0-H1.0-P0.50, ModelTransform=78.74,78.74,0,0,0,0,0.001,-0.004,0, Output Bits=12bit, Sensor Type=加速度计, Supplier=LCSC, Supplier Footprint=LGA-12(2x2), SupplierPart=C19274408, Symbol=SC7A20HTR
U21: "TQFN-40L"
U24: library part TMI2293Q, "IC-DCDC"
USB-A1: library part USB-A-2.4A

## Free pads (board coordinates)
  rect 3x3.5 smd: 15(-1.809,24.907) 16(-1.752,20.002) 17(-1.809,30.004)
  rect 3x3.5 smd far side: 16(-1.783,24.91) 16(-1.745,20.027)
  oval 3x2 hole 0.7 slot 2.4 at 0 deg: 18(4.067,40.935)

## Via types
v1: diameter 0.5, hole 0.3, Top Layer to Bottom Layer, tented both sides, 434 vias
v2: diameter 0.4, hole 0.3, Top Layer to Bottom Layer, tented both sides, 72 vias
v3: diameter 0.7, hole 0.5, Top Layer to Bottom Layer, tented both sides, 2 vias

## Nets (pads, with @x,y where several pads share a name; then routed paths per layer and width w, separated by ;. In a path a pad name is that pad's centre, name@x,y a point inside that pad or via, vN(x,y) a via of type N, cw(c..) or ccw(c..) an arc to the next point about the centre after c; other vN are vias at no path point)
1: C216.2 R221.2 | length 2.3
  Bottom Layer w0.5: C216.2@6.12,9.67 7.42,10.97 R221.2@7.85,10.97
2: 
3: Q23.G R26.2 R223.1 | length 5.2
  Signal Layer 1 w0.2: v2(11.4,12.29) 11.42,12.31 14.46,12.31 v2(14.48,12.33)
  Bottom Layer w0.2: v2(11.4,12.29) 11.42,12.31 11.81,12.31 R223.1@11.83,12.33 11.93,12.43 Q23.G@11.93,13.56 ; v2(14.48,12.33) R26.2@14.89,12.33
3V: 
4: 
22: C6.2 U2.6 | length 1.4
  Bottom Layer w0.3: U2.6@1.585,34.132 1.585,33.795 2.024,33.356 C6.2@2.024,32.864
A1: Q25.3 R26.1 | length 2.1
  Bottom Layer w0.3: R26.1@15.74,12.33 15.808,12.262 Q25.3@17.812,12.262
A2: Q25.1 R25.1 | length 1.6
  Bottom Layer w0.2: Q25.1@18.566,14.381 19.09,14.905 R25.1@19.9,14.905
BACK_LED: U3.19
BK_EN: 
BOOT0: U3.31
BST1: 
BST2: 
BUTTON: U2.1 U3.7 | length 25.8
  Signal Layer 1 w0.2: v2(1.59,35.89) 2.13,36.43 12.89,36.43 14.076,35.244 14.076,34.276 14.641,33.71 14.641,33.26 15.009,32.892 17.005,32.892 20.838,29.06 v2(21.59,29.06)
  Bottom Layer w0.15: U3.7@21.098,29.698 21.542,29.254 21.542,29.108 v2(21.59,29.06)
  Bottom Layer w0.2: U2.1@1.585,36.732 1.585,35.895 v2(1.59,35.89)
CC1: 
"CC1 1": 
CC1-1: 
CC1-2: 
CC1C: 
CC2: 
"CC2 1": 
CC2C: 
CC21: 
CC22: 
COMP: 
COMP1: 
CS: 
CS_FLASH: 
CS_LCM: 
CSN: 
CSNA: 
CSNC: 
CSNC1: 
CSP: 
CSP1: 
CSP2: 
CSP3: 
CSP_A: R212.2 R215.2 USB-A1.4 USB-A1.5 USB-A1.6 | length 8.1
  Bottom Layer w0.2: R215.2@11.71,21.98 10.68,21.98 10.47,22.19 10.47,22.78 10.808,23.118 12.612,23.118 12.76,22.97 12.76,21.65 13.36,21.05 14.543,21.05 14.66,20.933 14.66,20.86 R212.2@14.76,20.76
CSP_A_P: C29.2 R212.1 U21.14 | length 3
  Bottom Layer w0.2: R212.1@15.61,20.76 15.635,20.785 C29.2@15.635,21.67 15.795,21.51 U21.14@17.67,21.51
CSP_C1: R211.2 R224.2 Type-C2.A1@6.892,34.51 Type-C2.A12@13.192,34.51 Type-C2.B1@13.192,33.11 Type-C2.B12@6.892,33.11 Type-C2.GND@8.042,31.88 Type-C2.GND@8.042,35.74 Type-C2.GND@12.042,31.88 Type-C2.GND@12.042,35.74 | length 23.2
  Top Layer w0.2: v2(15.38,33.47) 15.85,33.47 16.8,32.52 16.8,28.77 15.67,27.64 15.67,20.88 17.73,18.82 17.73,15.88 18.11,15.5 18.692,15.5 19.074,15.881 v2(19.074,15.97)
  Bottom Layer w0.2: v2(15.38,33.47) 15.38,32.34 R224.2@15.39,32.33 ; v2@19.074,15.92 19.112,15.959 19.112,16.212 19.115,16.215 19.115,16.265 19.215,16.365 R211.2@19.265,16.365
CSP_C2: R210.2 R214.2 Type-C2.A1@6.892,26.885 Type-C2.A12@13.192,26.885 Type-C2.B1@13.192,25.485 Type-C2.B12@6.892,25.485 Type-C2.GND@8.042,24.255 Type-C2.GND@8.042,28.115 Type-C2.GND@12.042,24.255 Type-C2.GND@12.042,28.115 | length 13.1
  Top Layer w0.2: v2(10.011,29.966) 10.099,29.878 10.099,29.206 10.495,28.81 12.955,28.81 14.97,26.795 14.97,23.68 14.9,23.61 ; 14.899,23.61 14.635,23.346 14.635,22.735 v2(15.05,22.32)
  Bottom Layer w0.2: R214.2@8.86,30 9.977,30 v2(10.011,29.966) ; R210.2@14.76,22.56 14.77,22.56 15.05,22.28 v2(15.05,22.32)
CSP_C2_P: C27.1 R210.1 U21.15 | length 3.2
  Bottom Layer w0.2: C27.1@15.635,23.47 15.635,22.585 R210.1@15.61,22.56 16.26,21.91 U21.15@17.67,21.91
CSP_C_P: C28.2 R211.1 U21.11 | length 4.7
  Bottom Layer w0.2: U21.11@17.67,20.31 17.418,20.31 17.418,20.027 18.02,19.425 18.02,17.41 C28.2@18.19,17.24 19.24,17.24 R211.1@19.265,17.215
CSPA: 
CSPC: 
D31_EN1: U3.11
D31_EN2: U3.10
D31_INT1: U3.13
D31_INT2: U3.12
DM1: 
DM2: 
DM3: 
DM21: 
DMA: 
DMA1: 
DMC: 
DMC1: 
DP1: 
DP2: 
DP3: 
DP21: 
DP22: 
DPA: 
DPA1: 
DPC: 
DPC1: 
EN: R220.1 U24.7FS | length 4.4
  Bottom Layer w0.2: U24.7FS@7.63,5.43 8.41,5.43 8.95,4.89 8.95,3.6 R220.1@7.85,2.5
EN-U2: R220.2 U21.7 | length 25.7
  Signal Layer 1 w0.2: v2(9.4,4.18) 13.29,4.18 17.62,8.51 17.62,10.17 20.11,12.66 v2(20.11,18.16)
  Bottom Layer w0.2: R220.2@7.85,1.2 8.49,1.84 8.49,2.645 9.3,3.455 9.3,4.026 9.4,4.126 v2(9.4,4.18) ; U21.7@19.77,19.41 19.77,18.5 v2(20.11,18.16)
FB: 
FB1: 
FB2: 
FB_IC: 
FBO2: C215.2 R218.2 R219.1 U21.22 U24.1FB | length 49.8
  Top Layer w0.2: v2(2.98,2.49) 4.55,0.92 15.09,0.92 17.56,3.39 17.56,10.1 20.14,12.68 20.14,16.481 21.86,18.201 21.86,24.455 21.085,25.23 18.395,25.23 v2(18.28,25.115)
  Bottom Layer w0.2: U24.1FB@1.992,4.16 1.85,4.018 R219.1@1.85,2.5 1.86,2.49 v2(2.98,2.49) ; v2@2.99,2.5 3,2.49 3.84,2.49 C215.2@3.85,2.5 R218.2@5.85,2.5 ; v2(18.28,25.115) 18.97,25.115 U21.22@18.97,24.81
FC: 
FC1: 
FL_CLK: 
FL_CS: 
FL_MISO: 
FL_MOSI: 
FLASH_CLK: U3.26 U4.6 | length 3
  Bottom Layer w0.15: U3.26@21.098,34.082 21.503,34.487 21.503,35.073 22.44,36.01 U4.6@22.44,36.525
FLASH_CS: U3.29 U4.1 | length 10.9
  Signal Layer 1 w0.15: v2(20.26,41.13) 20.26,41.119 20.461,40.917 20.461,39.826 21.204,39.083 21.204,34.716 22,33.92 v2(22.68,33.92)
  Bottom Layer w0.15: U4.1@19.9,42.225 19.9,41.62 20.26,41.26 v2(20.26,41.13) ; U3.29@21.946,33.234 22.633,33.92 v2(22.68,33.92)
FLASH_MISO: U3.27 U4.2 | length 9.5
  Signal Layer 1 w0.15: v2(20.88,41.13) 20.88,41.062 20.761,40.944 20.761,39.95 21.504,39.207 21.504,34.84 21.757,34.587 v2(22.019,34.587)
  Bottom Layer w0.15: v2(20.88,41.13) 20.88,41.32 21.17,41.61 U4.2@21.17,42.225 ; U3.27@21.381,33.799 22.019,34.438 v2(22.019,34.587)
FLASH_MOSI: U3.28 U4.5 | length 3.9
  Bottom Layer w0.15: U3.28@21.664,33.516 23.71,35.563 U4.5@23.71,36.525
G1: 
G2: 
G3: 
G4: 
GATEA: 
GATEA1: 
GATEC: 
GATEC1: 
GND: C2.1 C2A. C4.1 C5.2 C6.1 C7.1 C8.2 C9.2 C11.2 C12.1 C13.1 C14.1 C15.2 C27.2 C28.1 C29.1 C210.1 C211.2 C212.2 C213.2 C214.1 C216.1 C218.1 CN1.2 CN1.9 CN1.10 EC2.2 pad.15 pad.16@-1.783,24.91 Q25.2 R4.1 R213.2 R214.1 R215.1 R219.2 R224.1 RNTC1.2 U1.2 U2.2 U3.16 U3.33 U4.4 U5.1 U5.4 U5.8 U5.9 U21.9 U21.10 U21.12 U21.16 U21.17 U21.41 U24.8GND | length 62.3
  Top Layer w0.2: v2(10.56,29.966) 10.56,29.912 10.449,29.801 10.449,29.351 10.64,29.16 13.1,29.16 15.32,26.94 15.32,23.395 v2(15.085,23.16) ; v2(15.38,34.03) 15.43,33.98 15.835,33.98 17.15,32.665 17.15,28.625 16.02,27.495 16.02,21.025 18.08,18.965 18.08,16.025 18.255,15.85 18.406,15.85 v2(18.526,15.97)
  Bottom Layer w0.2: R215.1@8.86,21.98 9.85,21.98 10.12,22.25 10.12,22.925 10.663,23.468 12.757,23.468 13.11,23.115 13.11,21.795 13.505,21.4 14.465,21.4 14.585,21.52 14.635,21.52 14.735,21.62 C29.1@14.735,21.67 14.2,22.205 14.2,23.89 14.67,24.36 16.18,24.36 16.44,24.1 16.44,22.94 16.67,22.71 U21.17@17.67,22.71 ; v2(10.56,29.966) 11.676,29.966 R214.1@11.71,30 ; v2(15.085,23.16) 15.045,23.16 C27.2@14.735,23.47 15.235,23.97 15.939,23.97 16.085,23.824 16.085,22.58 16.355,22.31 U21.16@17.67,22.31 ; v2(15.38,34.03) 15.38,35.17 R224.1@15.39,35.18 ; U5.1@16.938,27.317 17.68,28.059 v2(17.68,28.45) ; U21.12@17.67,20.71 17.07,20.71 16.87,20.51 16.87,20.08 17.67,19.28 17.67,16.86 C28.1@18.19,16.34 18.24,16.34 18.488,16.092 18.488,16.008 v2(18.526,15.97)
  other v1: 9.86,0.45 10.45,0.45 11.04,0.45 11.63,0.45 12.22,0.45 12.81,0.45 0.713,0.695 17.513,0.695 18.113,0.695 18.713,0.695 19.313,0.695 19.913,0.695 20.513,0.695 21.113,0.695 21.713,0.695 22.313,0.695 0.713,1.295 19.313,1.295 19.913,1.295 14.43,1.61 0.713,1.895 19.313,1.895 19.913,1.895 0.713,2.495 19.313,2.495 19.913,2.495 12.45,2.59 0.713,3.095 19.913,3.095 12.47,3.13 0.713,3.695 0.713,4.895 5.75,4.904 9.713,4.895 10.313,4.895 10.913,4.895 11.513,4.895 12.113,4.895 18.713,4.895 19.313,4.895 5.249,5.408 5.749,5.408 9.113,5.495 11.513,5.495 12.113,5.495 22.913,5.495 23.513,5.495 24.113,5.495 5.249,5.928 5.749,5.928 0.713,6.095 12.113,6.095 22.913,6.095 23.513,6.095 24.113,6.095 4.75,6.43 5.244,6.43 5.744,6.43 12.113,6.695 22.313,6.695 22.913,6.695 23.513,6.695 24.113,6.695 3.736,6.934 4.23,6.934 4.749,6.934 5.243,6.934 5.743,6.934 12.113,7.295 12.713,7.295 13.313,7.295 13.913,7.295 14.513,7.295 15.113,7.295 19.913,7.295 20.513,7.295 21.713,7.295 22.313,7.295 22.913,7.295 23.513,7.295 24.113,7.295 3.736,7.454 4.23,7.454 4.749,7.454 5.243,7.454 5.743,7.454 12.713,7.895 13.313,7.895 14.513,7.895 15.113,7.895 20.513,7.895 21.713,7.895 22.313,7.895 22.913,7.895 23.513,7.895 24.113,7.895 3.725,7.947 4.235,7.947 4.755,7.947 5.229,7.947 5.749,7.947 3.725,8.447 4.235,8.447 4.755,8.447 5.229,8.447 5.749,8.447 11.078,8.51 11.588,8.51 12.108,8.51 13.028,8.5 13.538,8.5 14.058,8.5 23.513,8.495 24.113,8.495 3.725,8.941 4.235,8.941 4.755,8.941 5.229,8.941 11.078,9.01 11.588,9.01 12.108,9.01 13.028,9 13.538,9 14.058,9 10.313,9.095 24.113,9.095 13.028,9.494 13.538,9.494 14.058,9.494 11.078,9.504 11.588,9.504 12.108,9.504 9.713,9.695 10.313,9.695 24.113,9.695 9.113,10.295 21.713,10.295 23.513,10.295 24.113,10.295 3.713,10.895 22.313,10.895 22.913,10.895 23.513,10.895 24.113,10.895 19.313,13.895 3.713,14.495 6.713,14.495 3.713,15.095 4.313,15.095 4.913,15.095 5.513,15.095 6.113,15.095 24.113,15.095 22.369,15.181 22.719,15.531 21.98,15.55 4.913,15.695 5.513,15.695 22.37,16.04 4.913,16.295 14.26,17.42 23.513,18.695 23.513,19.295 3.713,19.895 19.045,21.004 20.203,21.004 21.36,21.004 7.335,21.497 7.845,21.497 8.365,21.497 20.78,21.53 19.63,21.55 7.335,21.997 7.845,21.997 8.365,21.997 6.836,22.001 19.045,22.074 20.203,22.074 21.36,22.074 6.836,22.495 7.335,22.491 7.845,22.491 8.365,22.491 20.77,22.53 19.61,22.6 19.045,23.12 20.203,23.12 21.36,23.12 -2.486,23.752 -1.724,23.752 -0.962,23.752 -2.486,24.514 -1.724,24.514 -0.962,24.514 -2.486,25.276 -1.724,25.276 -0.962,25.276 -2.486,26.038 -1.724,26.038 -0.962,26.038 23.25,26.92 -2.287,27.095 -1.687,27.095 -1.087,27.095 -0.487,27.095 22.9,27.29 -2.287,27.695 -1.687,27.695 -1.087,27.695 17.513,27.695 19.2,28.17 24.27,28.65 14.415,28.762 24.1,29.6 12.67,29.675 13.17,29.675 14.41,30.018 13.9,30.03 14.9,30.032 15.395,30.032 15.89,30.032 12.67,30.17 13.17,30.17 24.28,30.36 13.661,30.489 14.39,30.518 14.88,30.532 15.375,30.532 15.87,30.532 10.15,30.56 10.65,30.56 20.45,30.59 12.67,30.665 13.17,30.665 16.3,30.841 13.43,31.04 13.92,31.03 14.42,31.04 14.909,31.053 15.404,31.053 15.899,31.053 10.14,31.08 10.64,31.08 11.15,31.08 11.66,31.08 12.17,31.08 12.93,31.09 21.07,31.27 0.113,31.295 0.713,31.295 1.313,31.295 1.913,31.295 2.513,31.295 19.75,31.36 23.54,31.81 0.713,31.895 1.313,31.895 1.913,31.895 21.74,31.89 20.36,32 19.03,32.02 23.74,32.44 20.96,32.66 19.7,32.68 23.59,33.11 3.68,33.19 20.33,33.32 0.713,33.695 23.62,33.86 0.713,34.295 23.72,34.58 0.713,34.895 4.313,34.895 0.713,35.495 2.513,35.495 3.113,35.495 3.713,35.495 4.313,35.495 4.913,35.495 0.713,36.095 15.858,36.432 16.368,36.432 16.888,36.432 0.713,36.695 17.47,36.7 15.36,36.92 15.858,36.926 16.368,36.926 16.888,36.926 17.976,37.147 18.486,37.147 19.006,37.147 4.313,37.295 4.913,37.295 5.513,37.295 6.113,37.295 6.713,37.295 7.313,37.295 14.818,37.416 15.328,37.416 15.848,37.416 17.976,37.647 18.486,37.647 19.006,37.647 4.913,37.895 5.513,37.895 6.113,37.895 6.713,37.895 7.313,37.895 14.818,37.916 15.328,37.916 15.848,37.916 17.976,38.141 18.486,38.141 19.006,38.141 14.818,38.41 15.328,38.41 15.848,38.41 7.313,38.495 23.513,38.495 24.113,38.495 7.313,39.095 16.913,39.095 17.513,39.095 23.513,39.095 24.113,39.095 7.913,39.695 21.713,39.695 23.513,39.695 24.113,39.695 8.513,40.295 9.113,40.295 9.713,40.295 10.313,40.295 10.913,40.295 11.513,40.295 12.113,40.295 21.713,40.295 23.513,40.295 24.113,40.295 8.513,40.895 9.113,40.895 9.713,40.895 10.313,40.895 10.913,40.895 11.513,40.895 12.113,40.895 21.713,40.895 23.513,40.895 24.113,40.895 7.913,41.495 8.513,41.495 9.113,41.495 9.713,41.495 10.313,41.495 10.913,41.495 11.513,41.495 12.113,41.495 15.113,41.495 15.713,41.495 7.313,42.095 7.913,42.095 8.513,42.095 9.113,42.095 9.713,42.095 10.313,42.095 10.913,42.095 11.513,42.095 12.113,42.095 12.713,42.095 13.313,42.095 13.913,42.095 14.513,42.095 15.113,42.095 15.713,42.095 18.713,42.095 7.313,42.695 7.913,42.695 8.513,42.695 9.113,42.695 9.713,42.695 10.313,42.695 10.913,42.695 11.513,42.695 12.113,42.695 12.713,42.695 13.313,42.695 13.913,42.695 14.513,42.695 15.113,42.695 15.713,42.695 18.113,42.695 18.713,42.695
GND_A: 
GND_C1: 
GND_C2: 
GPIO1: R213.1 RNTC1.1 U21.8 | length 7.5
  Bottom Layer w0.2: U21.8@19.37,19.41 19.37,18.185 R213.1@20.34,17.215 20.96,16.595 20.96,15.754 23.154,13.56 RNTC1.1@23.28,13.56
GPIO2: 
HGATE: 
HGATE1: 
HOLD: 
HV: 
I2C_SCL: 
I2C_SCL1: R10.2 U3.15 U5.12 | length 3.7
  Bottom Layer w0.2: U5.12@16.558,28.068 17.18,28.69 R10.2@17.18,29.26 17.18,30.164 U3.15@18.128,31.112
I2C_SDA: 
I2C_SDA1: R9.1 U3.14 U5.2 | length 6.3
  Bottom Layer w0.15: U5.2@16.585,26.964 16.928,26.62 17.5,26.62 18.359,27.479 R9.1@18.359,28.051
  Bottom Layer w0.2: R9.1@18.359,28.051 18.359,28.821 17.58,29.6 17.58,29.999 U3.14@18.411,30.829
IBO: 
IBO1: 
IC-CC1_C1: Type-C2.B5CC2@11.392,33.11 U21.28 | length 14.9
  Signal Layer 1 w0.15: Type-C2.B5CC2@11.392,33.11 11.917,32.585 13.36,32.585 14.277,31.668 16.498,31.668 21.672,26.494 21.672,26.313 v2(21.72,26.265)
  Bottom Layer w0.15: U21.28@21.37,24.81 21.37,25.861 21.72,26.211 v2(21.72,26.265)
IC-CC1_C2: Type-C2.B5CC2@11.392,25.485 U21.26 | length 11.5
  Signal Layer 1 w0.15: Type-C2.B5CC2@11.392,25.485 11.927,24.95 12.59,24.95 12.6,24.96 13.409,24.96 13.989,25.54 19.276,25.54 19.576,25.84 20.252,25.84 20.623,26.211 v2(20.623,26.265)
  Bottom Layer w0.15: U21.26@20.57,24.81 20.57,26.212 v2(20.623,26.265)
IC-CC2_C1: "Type-C2.A5 CC1"@8.692,34.51 U21.27 | length 23.8
  Signal Layer 1 w0.15: 8.692,34.51 9.217,35.035 13.409,35.035 13.751,34.693 13.751,34.141 14.317,33.576 14.317,32.901 14.65,32.568 16.871,32.568 22.935,26.503 22.935,25.325 22.68,25.07 22.289,25.07 21.173,26.186 v2(21.173,26.265)
  Bottom Layer w0.15: U21.27@20.97,24.81 20.97,26.011 21.173,26.214 v2(21.173,26.265) v2@21.175,26.263
IC-CC2_C2: "Type-C2.A5 CC1"@8.692,26.885 U21.25 | length 13.8
  Signal Layer 1 w0.15: 8.692,26.885 9.237,27.43 13.444,27.43 14.435,26.44 18.54,26.44 18.79,26.69 19.702,26.69 20.076,26.316 v2(20.076,26.265)
  Bottom Layer w0.15: v2@20.076,26.281 20.17,26.186 U21.25@20.17,24.81